# EAGLE board tangled_polish (EAGLE 6.6.0)

Size 50 x 40 mm. Coordinates in mm from the lower left corner, seen from the top.
Outline: 0,0 50,0 50,40 0,40 0,0
Copper layers (1*16): Top / Bottom
Design rules "default": minimum track width 10mil, minimum drill 24mil, track to track 8mil, track to pad 8mil, pad to pad 8mil, via to via 8mil, copper to edge 40mil

## Footprints (pad centres in the part's own frame; a part is rotated, then mirrored left to right if it is on the bottom)
R0805 = smd 1 x 1.3: 1 -0.95,0; 2 0.95,0
HDR-1X4 = drill 1 pad 1.778: 1 0,3.81; 2 0,1.27; 3 0,-1.27; 4 0,-3.81
SOIC-8 = smd 1.5 x 0.6: 1 -2.7,1.905; 2 -2.7,0.635; 3 -2.7,-0.635; 4 -2.7,-1.905; 5 2.7,-1.905; 6 2.7,-0.635; 7 2.7,0.635; 8 2.7,1.905

## Placement (x,y rotation side)
C1  100nF  [R0805]  12,34 90 top
C2  100nF  [R0805]  38,6 90 top
J1  IN_HDR  [HDR-1X4]  5,20 0 top
J2  OUT_HDR  [HDR-1X4]  45,20 0 top
R1  10k  [R0805]  15,10 180 top
R2  10k  [R0805]  15,30 180 top
R3  10k  [R0805]  35,10 180 top
R4  10k  [R0805]  35,30 180 top
U1  OPAMP  [SOIC-8]  25,20 0 top

## Library data of the parts
C1 C2 J1 J2 R1-R4 U1 = synthetic

## Nets
FILTER_L: C1.1 U1.3
FILTER_R: C2.1 U1.6
GND: C1.2 C2.2 J1.4 J2.4 U1.4
IN_A: J1.1 R1.1
IN_B: J1.2 R2.1
OUT_A: J2.1 R3.2
OUT_B: J2.2 R4.2
U1_IN_A: R1.2 U1.1
U1_IN_B: R2.2 U1.2
U1_OUT_A: R3.1 U1.8
U1_OUT_B: R4.1 U1.7
VCC: J1.3 J2.3 U1.5